# Altium PCB NB3000XN.PcbDoc (part 61 of 71)
Units mil, origin at the board's own origin, x right, y up, seen from the top; angles counter-clockwise.
Board outline 9527.56 x 6929.77 mil, 6 copper layers (Top Layer, GND+SHIELD, MidLayer1, MidLayer2, P2 - 3V3+5V0, Bottom Layer), stack 62.375 mil thick; 832 components, 1027 nets, 4655 pads, 4981 vias.
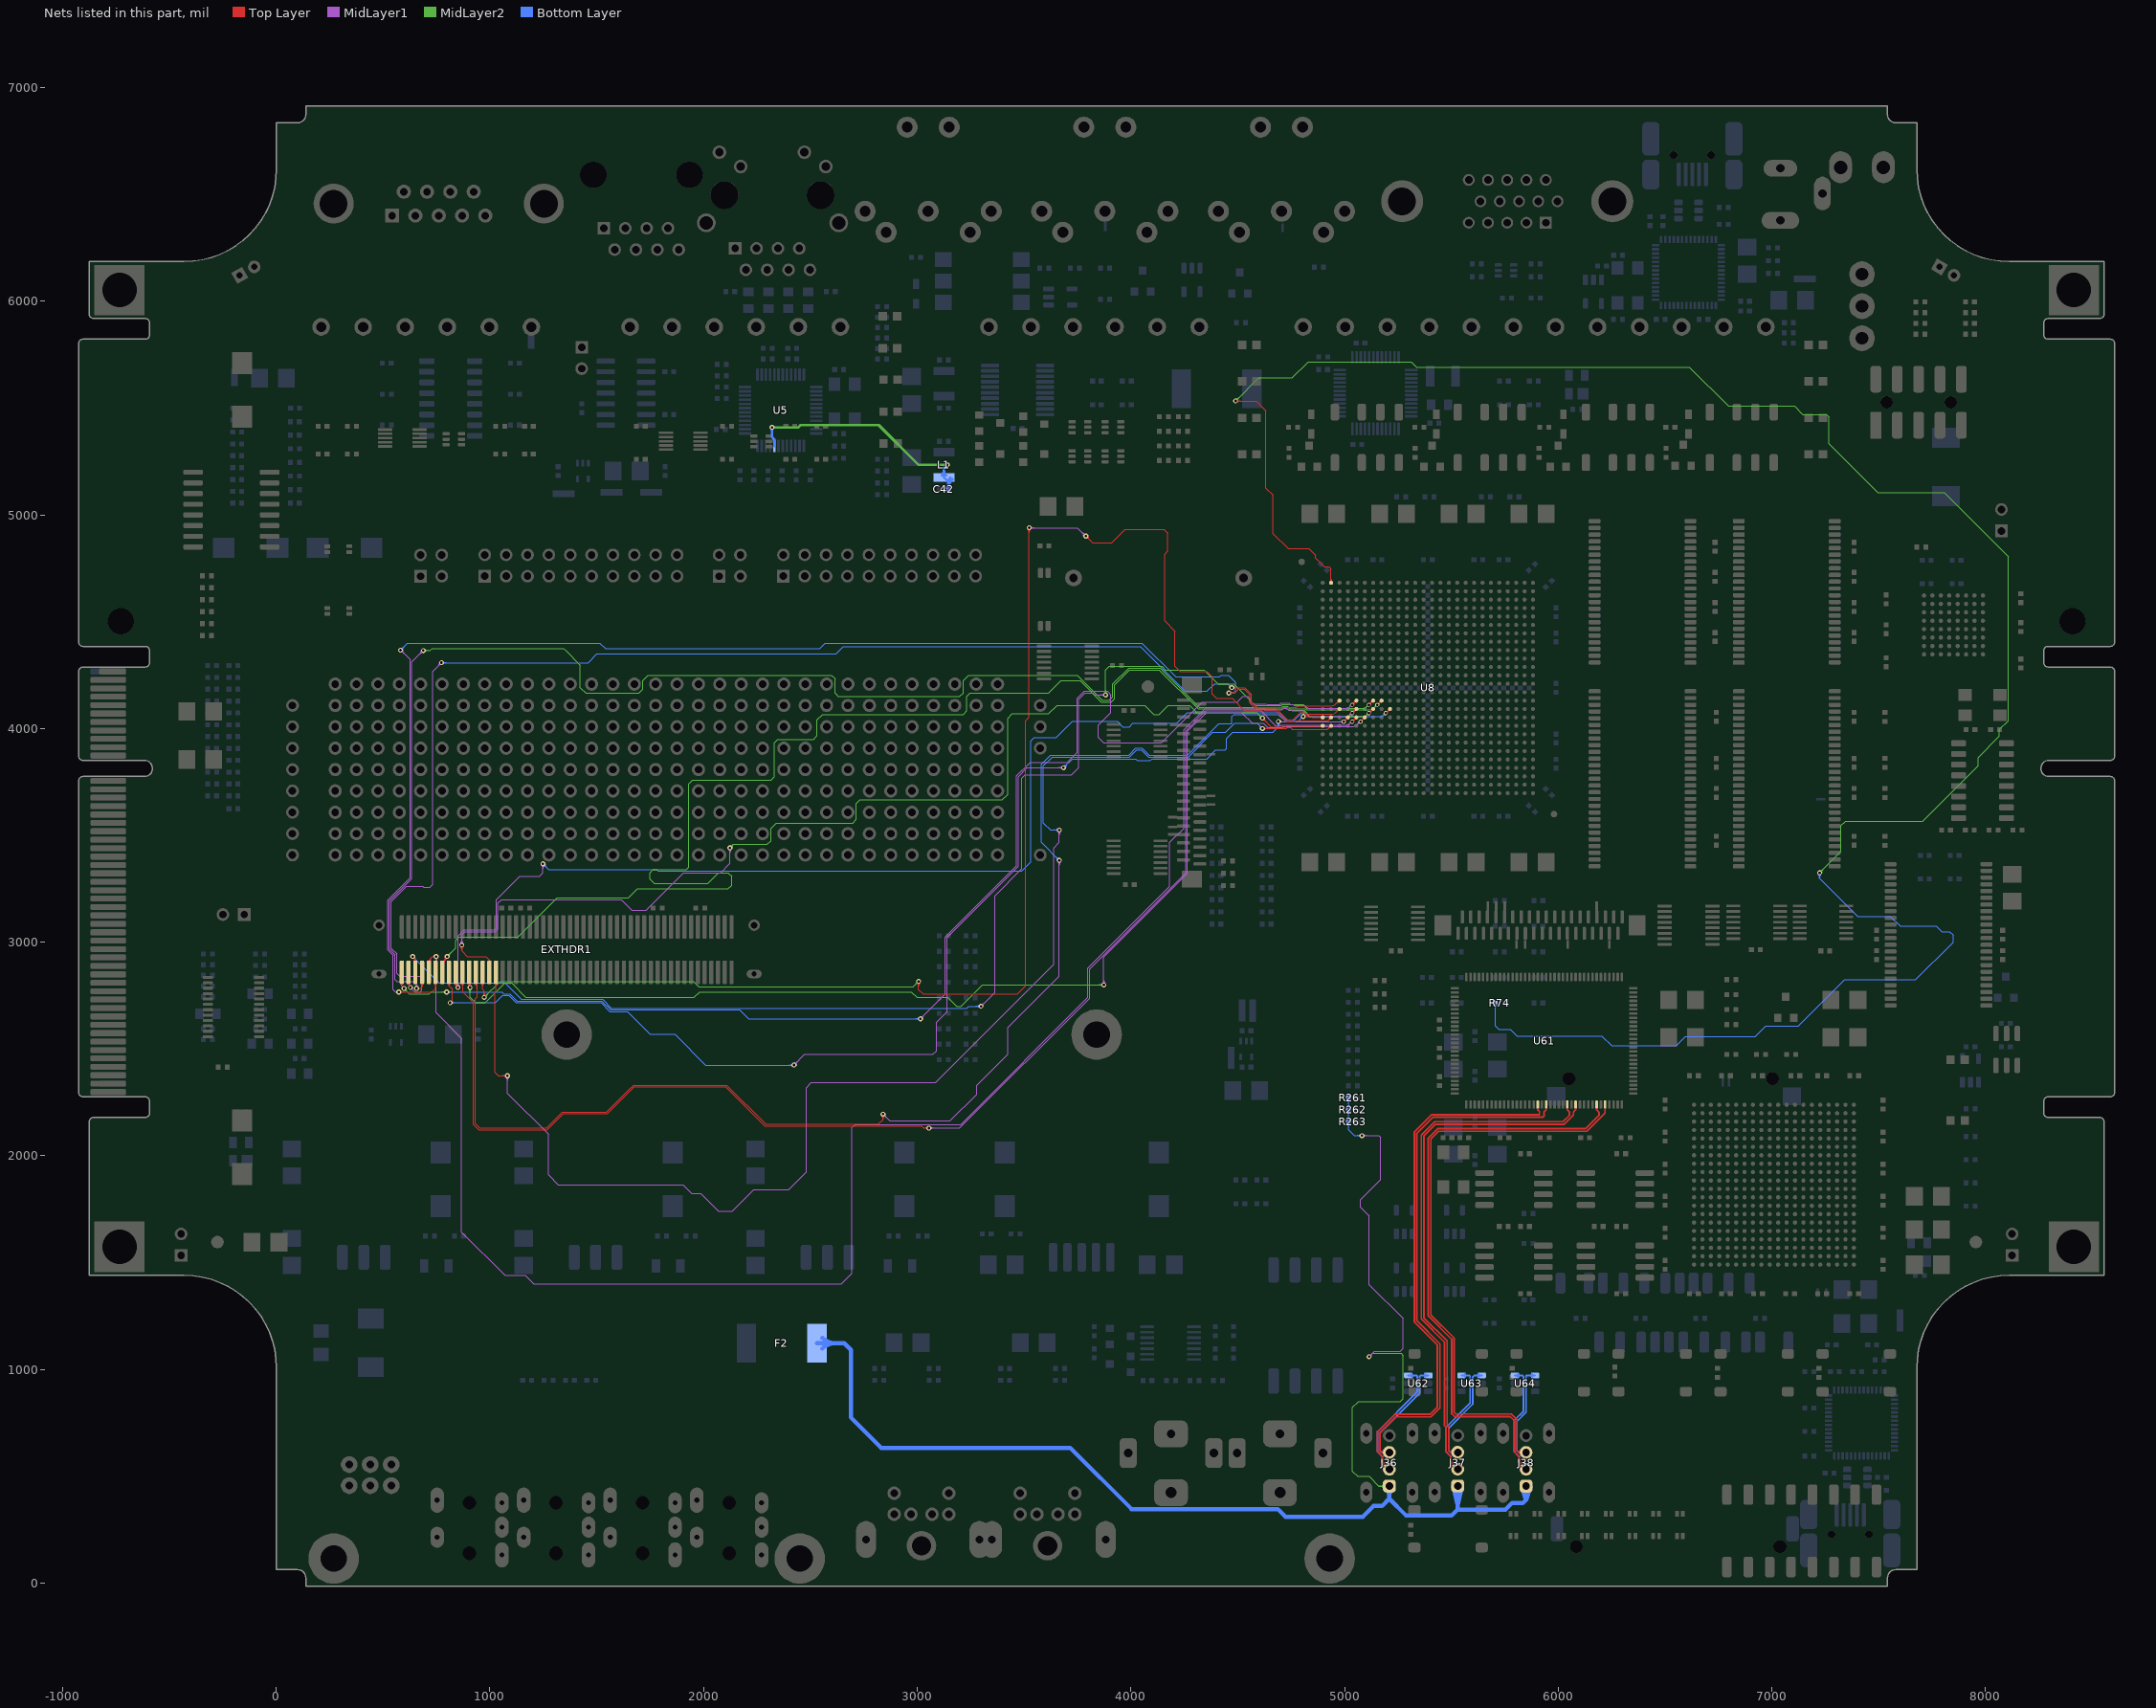
[diagram p65: the nets of this part, all layers, seen from the top]

## Via types
v1: diameter 23, hole 11.81, Top Layer to Bottom Layer, 3672 vias
v2: diameter 26, hole 11.81, Top Layer to Bottom Layer, 461 vias
v3: diameter 19, hole 11.81, Top Layer to Bottom Layer, tented both sides, 396 vias
v4: diameter 23.62, hole 11.81, Top Layer to Bottom Layer, 288 vias
v5: diameter 20, hole 11.81, Top Layer to Bottom Layer, 91 vias
v6: diameter 23, hole 11.81, Top Layer to Bottom Layer, tented both sides, 50 vias
v7: diameter 31, hole 11.81, Top Layer to Bottom Layer, 15 vias
v8: diameter 27.56, hole 11.81, Top Layer to Bottom Layer, tented both sides, 4 vias
v9: diameter 29, hole 11.81, Top Layer to Bottom Layer, 3 vias
v10: diameter 21, hole 11.81, Top Layer to Bottom Layer, 1 vias

## Nets (pads, with @x,y where several pads share a name; then routed paths per layer and width w, separated by ;. In a path a pad name is that pad's centre, name@x,y a point inside that pad or via, vN(x,y) a via of type N, cw(c..) or ccw(c..) an arc to the next point about the centre after c; other vN are vias at no path point) (continued)
PBIO.D35: EXTHDR1.72 U8.V2 | length 7156.9
  Top Layer w4: EXTHDR1.72@1023.3,2808.48 cw(c1009.65,2794.82) 1028.96,2794.82 cw(c1048.27,2794.82) EXTHDR1.72@1034.62,2808.48 ; EXTHDR1.72@1028.96,2814.13 EXTHDR1.72@1028.96,2859.25 1028.96,2770.43 1023.52,2765 1023.52,2391.71 1040.19,2375.04 v1(1081.86,2375.04) ; v1@1075.14,2368.32 ccw(c1058.92,2352.11) 1058.92,2375.04 ccw(c1058.92,2397.98) v1@1075.14,2381.76 ; v1@1077.97,2371.15 ccw(c1068.58,2361.76) 1068.58,2375.04 ccw(c1068.58,2388.32) v1@1077.97,2378.93 ; v1(4616.19,4000.04) 4727.77,4000.04 4732.94,4005.21 4747.44,4005.21 ; v1@4620.08,3996.15 cw(c4629.47,3986.76) 4629.47,4000.04 cw(c4629.47,4013.32) v1@4620.08,4003.93 ; v1@4622.91,3993.32 cw(c4639.13,3977.11) 4639.13,4000.04 cw(c4639.13,4022.98) v1@4622.91,4006.76 ; 4752.65,4000 4747.44,4005.21 ; U8.V2@4929.9,4012.83 cw(c4912.17,4012.83) 4924.71,4000.3 ; U8.V2@4937.24,4005.49 ccw(c4937.24,3987.77) 4924.71,4000.3 ; 4747.44,4005.21 4755.32,3997.33 4860,3997.33 4870,3997.33 4917.53,3997.33 ccw(c4917.53,4007.48) 4924.71,4000.3
  MidLayer1 w4: v1@1075.14,2368.32 cw(c1058.92,2352.11) 1081.86,2352.11 cw(c1104.79,2352.11) v1@1088.57,2368.32 ; v1@1077.97,2371.15 cw(c1068.58,2361.76) 1081.86,2361.76 cw(c1095.14,2361.76) v1@1085.75,2371.15 ; v1(1081.86,2375.04) 1081.86,2293.14 1273.86,2101.14 1273.86,1911.14 1320,1865 1905,1865 1945,1825 1986.71,1825 2070,1741.71 2135,1741.71 2235.29,1842 2398.82,1842 2481.86,1925.04 2481.86,2319.23 2505.13,2342.5 3085.63,2342.5 3108.73,2365.6 ; 3090.98,2347.85 3640,2896.87 3640,3441.52 3665.19,3466.71 v1(3665.19,3525.04) ; v1@3658.47,3518.32 cw(c3642.26,3502.11) 3665.19,3502.11 cw(c3688.13,3502.11) v1@3671.91,3518.32 ; v1@3661.3,3521.15 cw(c3651.91,3511.76) 3665.19,3511.76 cw(c3678.47,3511.76) v1@3669.08,3521.15
  Bottom Layer w4: v1@3658.47,3518.32 ccw(c3642.26,3502.11) 3642.26,3525.04 ccw(c3642.26,3547.98) v1@3658.47,3531.76 ; v1@3661.3,3521.15 ccw(c3651.91,3511.76) 3651.91,3525.04 ccw(c3651.91,3538.32) v1@3661.3,3528.93 ; v1(3665.19,3525.04) 3623.52,3525.04 3590.19,3558.37 3590.19,3825.04 3631.86,3866.71 3993.17,3866.71 4026.5,3900.04 4049.52,3900.04 4082.86,3866.71 4268.17,3866.71 4383.84,3982.37 4410,3982.37 4443.19,3982.37 4485.86,4025.04 4591.19,4025.04 v1(4616.19,4000.04) ; v1@4606.69,4000.04 ccw(c4583.76,4000.04) 4599.97,4016.26 ccw(c4616.19,4032.48) v1@4616.19,4009.54 ; v1@4610.69,4000.04 ccw(c4597.41,4000.04) 4606.8,4009.43 ccw(c4616.19,4018.82) v1@4616.19,4005.54
PBIO.D36: EXTHDR1.74 U8.V1 | length 5688.9
  Top Layer w4: v1@861.81,2979.99 cw(c845.59,2963.77) 868.52,2963.77 cw(c891.46,2963.77) v1@875.24,2979.99 ; v1@864.64,2982.82 cw(c855.25,2973.43) 868.52,2973.43 cw(c881.8,2973.43) v1@872.41,2982.82 ; v1(868.52,2986.71) 868.52,2958.37 893.52,2933.37 981.86,2933.37 997.46,2917.77 ; EXTHDR1.74@993.67,2911.41 ccw(c990.24,2917.77) 997.46,2917.77 ; EXTHDR1.74@997.46,2859.25 997.46,2917.77 ; EXTHDR1.74@1001.26,2911.41 cw(c1004.69,2917.77) 997.46,2917.77 ; v1@4616.19,4039.54 cw(c4616.19,4016.61) 4632.41,4032.82 cw(c4648.63,4049.04) v1@4625.69,4049.04 ; v1@4616.19,4043.54 cw(c4616.19,4030.26) 4625.58,4039.65 cw(c4634.97,4049.04) v1@4621.69,4049.04 ; v1(4616.19,4049.04) 4656.86,4008.37 4724.79,4008.37 4729.63,4013.21 4750.75,4013.21 4751.13,4012.83 4860,4012.83 4870,4012.83 U8.V1@4897.87,4012.83 ; U8.V1@4892.57,4007.53 ccw(c4879.77,3994.73) 4879.77,4012.83 ccw(c4879.77,4030.94) U8.V1@4892.57,4018.14 ; U8.V1@4892.68,4007.64 ccw(c4880.15,3995.11) 4880.15,4012.83 ccw(c4880.15,4030.56) U8.V1@4892.68,4018.03
  MidLayer1 w4: v1@861.81,2993.43 ccw(c845.59,3009.64) 868.52,3009.64 ccw(c891.46,3009.64) v1@875.24,2993.43 ; v1@864.64,2990.6 ccw(c855.25,2999.99) 868.52,2999.99 ccw(c881.8,2999.99) v1@872.41,2990.6 ; v1(868.52,2986.71) 868.52,3035.9 882.34,3049.71 1024.71,3049.71 1038,3063 1038,3183 1055.04,3200.04 1615.19,3200.04 1665.19,3150.04 1731.86,3150.04 1906.82,3325 2080,3325 2123.52,3368.52 v1(2123.52,3441.71) ; v1@2116.81,3434.99 cw(c2100.59,3418.77) 2123.52,3418.77 cw(c2146.46,3418.77) v1@2130.24,3434.99 ; v1@2119.64,3437.82 cw(c2110.25,3428.43) 2123.52,3428.43 cw(c2136.8,3428.43) v1@2127.41,3437.82
  MidLayer2 w4: v1(2123.52,3441.71) 2140.19,3458.37 2298.52,3458.37 2315.19,3475.04 2315.19,3533.37 2340.19,3558.37 2698.52,3558.37 2715.19,3575.04 2715.19,3650.04 2731.86,3666.71 3398.52,3666.71 3423.52,3691.71 3423.52,4048.52 3445,4070 3615.48,4070 3654.19,4108.71 4064.86,4108.71 4106.86,4066.71 4131.86,4066.71 4173.86,4108.71 4275.56,4108.71 4308.9,4075.37 4589.86,4075.37 v1(4616.19,4049.04) ; v1@2123.52,3447.21 ccw(c2123.52,3460.49) 2132.91,3451.1 ccw(c2142.3,3441.71) v1@2129.02,3441.71 ; v1@2123.52,3451.21 ccw(c2123.52,3474.14) 2139.74,3457.93 ccw(c2155.96,3441.71) v1@2133.02,3441.71 ; v1@4606.69,4049.04 ccw(c4583.76,4049.04) 4599.97,4065.26 ccw(c4616.19,4081.48) v1@4616.19,4058.54 ; v1@4610.69,4049.04 ccw(c4597.41,4049.04) 4606.8,4058.43 ccw(c4616.19,4067.82) v1@4616.19,4054.54
PBIO.D37: EXTHDR1.76 U8.U2 | length 7725.5
  Top Layer w4: EXTHDR1.76@960.31,2808.48 cw(c948.53,2796.69) 965.19,2796.69 ; 965.19,2792.94 cw(c987.16,2792.94) EXTHDR1.76@971.62,2808.48 ; 965.19,2802.6 cw(c977.5,2802.6) EXTHDR1.76@968.8,2811.3 ; EXTHDR1.76@965.19,2857.71 965.19,2780 973.52,2771.67 v1(973.52,2741.71) ; v1@966.81,2748.43 ccw(c950.59,2764.64) 973.52,2764.64 ccw(c996.46,2764.64) v1@980.24,2748.43 ; v1@969.64,2745.6 ccw(c960.25,2754.99) 973.52,2754.99 ccw(c986.8,2754.99) v1@977.41,2745.6 ; v1@3000.14,2809.99 cw(c2983.92,2793.77) 3006.86,2793.77 cw(c3029.79,2793.77) v1@3013.57,2809.99 ; v1@3002.97,2812.82 cw(c2993.58,2803.43) 3006.86,2803.43 cw(c3020.14,2803.43) v1@3010.75,2812.82 ; v1(3006.86,2816.71) 3006.86,2778.14 3027.46,2757.54 3469.4,2757.54 3506.86,2795 3506.86,4036.36 3523.86,4053.36 3523.86,4939.86 v4(3524,4940) ; v4@3517.06,4933.06 cw(c3500.66,4916.66) 3523.86,4916.66 ; v4@3519.89,4935.89 cw(c3510.32,4926.32) 3523.86,4926.32 ; 3523.86,4915.97 cw(c3548.03,4915.97) v4@3530.94,4933.06 ; 3523.86,4925.63 cw(c3538.37,4925.63) v4@3528.11,4935.89 ; v4@3789,4891.19 cw(c3789,4867.5) 3805.75,4884.25 cw(c3822.5,4901) v4@3798.81,4901 ; v4@3789,4895.19 cw(c3789,4881.16) 3798.92,4891.08 cw(c3808.84,4901) v4@3794.81,4901 ; v4(3789,4901) 3820,4870 3910.15,4870 3973.52,4933.37 4155,4933.37 4155,4933.04 4173.52,4914.52 4173.52,4832.02 4158,4816.5 4158,4503.86 4206.86,4455 4206.86,4291.71 4231.86,4266.71 4356.86,4266.71 4381.86,4241.71 4381.86,4161.36 4401.84,4141.37 4473.86,4141.37 4531.86,4083.37 4677.94,4083.37 4728.11,4033.21 4769.92,4033.21 4773.41,4036.7 4856.86,4036.7 ; 4855.26,4036.7 4860,4036.7 4870,4036.7 4917.53,4036.7 ; 4917.53,4036.7 ccw(c4917.53,4046.85) 4924.71,4039.67 ; 4917.53,4036.7 ccw(c4917.53,4046.85) 4924.71,4039.67 ; 4924.71,4039.67 ccw(c4912.17,4052.2) 4929.9,4052.2 cw(c4912.17,4052.2) 4924.71,4039.67 ; 4924.71,4039.67 cw(c4937.24,4027.14) 4937.24,4044.86 ccw(c4937.24,4027.14) 4924.71,4039.67
  MidLayer1 w4: v4(3524,4940) 3750,4940 v4(3789,4901) ; v4@3528.11,4935.89 cw(c3538.03,4925.97) 3538.03,4940 cw(c3538.03,4954.03) v4@3528.11,4944.11 ; v4@3530.94,4933.06 cw(c3547.69,4916.31) 3547.69,4940 cw(c3547.69,4963.69) v4@3530.94,4946.94 ; v4@3779.19,4901 ccw(c3755.5,4901) 3772.25,4917.75 ccw(c3789,4934.5) v4@3789,4910.81 ; v4@3783.19,4901 ccw(c3769.16,4901) 3779.08,4910.92 ccw(c3789,4920.84) v4@3789,4906.81
  MidLayer2 w4: v1(973.52,2741.71) 1048.52,2816.71 1920,2816.71 1952.98,2816.71 1977.98,2791.71 2131.86,2791.71 2140,2791.71 2981.86,2791.71 v1(3006.86,2816.71) ; v1@973.52,2747.21 ccw(c973.52,2760.49) 982.91,2751.1 ccw(c992.3,2741.71) v1@979.02,2741.71 ; v1@973.52,2751.21 ccw(c973.52,2774.14) 989.74,2757.93 ccw(c1005.96,2741.71) v1@983.02,2741.71 ; v1@2997.36,2816.71 cw(c2974.42,2816.71) 2990.64,2800.49 cw(c3006.86,2784.27) v1@3006.86,2807.21 ; v1@3001.36,2816.71 cw(c2988.08,2816.71) 2997.47,2807.32 cw(c3006.86,2797.93) v1@3006.86,2811.21
PBIO.D38: EXTHDR1.78 U8.U1 | length 6989.1
  Top Layer w4: EXTHDR1.78@928.81,2808.48 cw(c901.35,2781.01) 940.19,2781.01 ; EXTHDR1.78@931.64,2811.3 cw(c911.01,2790.67) 940.19,2790.67 ; EXTHDR1.78@934.47,2814.13 cw(c920.66,2800.32) 940.19,2800.32 ; EXTHDR1.78@940.19,2858.37 940.19,2745 931.52,2736.33 931.52,2150 951.52,2130 1265,2130 1340,2205 1546.31,2205 1651.23,2309.92 1672.31,2331 2107.69,2331 2290.69,2148 2818,2148 2840,2170 v1(2840,2195) ; v1@2833.28,2188.28 cw(c2817.06,2172.06) 2840,2172.06 cw(c2862.93,2172.06) v1@2846.72,2188.28 ; v1@2836.11,2191.11 cw(c2826.72,2181.72) 2840,2181.72 cw(c2853.28,2181.72) v1@2843.89,2191.11 ; v1(4806.86,4056.71) 4844.19,4056.71 4848.52,4052.37 4848.52,4052.2 4851.26,4052.2 4855.26,4052.2 4860,4052.2 4870,4052.2 U8.U1@4897.87,4052.2 ; U8.U1@4892.57,4046.9 ccw(c4879.77,4034.1) 4879.77,4052.2 ccw(c4879.77,4070.31) U8.U1@4892.57,4057.51 ; 4880.15,4052.2 cw(c4880.15,4034.48) 4892.68,4047.01 ccw(c4880.15,4034.48) 4880.15,4052.2 ; 4880.15,4052.2 ccw(c4880.15,4069.93) 4892.68,4057.4 cw(c4880.15,4069.93) 4880.15,4052.2
  MidLayer1 w4: v1@2840,2185.5 cw(c2840,2162.56) 2856.22,2178.78 cw(c2872.43,2195) v1@2849.5,2195 ; v1@2840,2189.5 cw(c2840,2176.22) 2849.39,2185.61 cw(c2858.78,2195) v1@2845.5,2195 ; v1(2840,2195) v1@2841.74,2193.26 ; v1@2840.19,2191.71 v1@2841.74,2193.26 ; v1@3658.47,3376.66 cw(c3642.26,3360.44) 3665.19,3360.44 cw(c3688.13,3360.44) v1@3671.91,3376.66 ; v1@3661.3,3379.49 cw(c3651.91,3370.1) 3665.19,3370.1 cw(c3678.47,3370.1) v1@3669.08,3379.49 ; v1(3665.19,3383.37) 3665.19,2841.71 3423.52,2600.04 3423.52,2475.04 3279.05,2330.57 3279.05,2288.22 3154.34,2163.5 2871.5,2163.5 v1@2841.74,2193.26
  Bottom Layer w4: v1@3655.69,3383.37 ccw(c3632.76,3383.37) 3648.97,3399.59 ccw(c3665.19,3415.81) v1@3665.19,3392.87 ; v1@3659.69,3383.37 ccw(c3646.41,3383.37) 3655.8,3392.76 ccw(c3665.19,3402.15) v1@3665.19,3388.87 ; v1(3665.19,3383.37) 3581.86,3466.71 3581.86,3833.37 3623.52,3875.04 3990.19,3875.04 4023.52,3908.37 4052.5,3908.37 4086.17,3874.71 4264.86,3874.71 4413.19,4023.04 4471.52,4023.04 4473.52,4025.04 4473.52,4056.37 4483.86,4066.71 4690.19,4066.71 4723.52,4033.37 4783.52,4033.37 v1(4806.86,4056.71) ; v1@4797.36,4056.71 cw(c4774.42,4056.71) 4790.64,4040.49 cw(c4806.86,4024.27) v1@4806.86,4047.21 ; v1@4801.36,4056.71 cw(c4788.08,4056.71) 4797.47,4047.32 cw(c4806.86,4037.93) v1@4806.86,4051.21
PBIO.D39: EXTHDR1.80 U8.U6 | length 5905.1
  Top Layer w4: EXTHDR1.80@897.32,2808.48 cw(c883.66,2794.82) 902.97,2794.82 cw(c922.29,2794.82) EXTHDR1.80@908.63,2808.48 ; v1@900.14,2795.09 ccw(c893.3,2801.94) 902.97,2801.94 ; v1@902.97,2792.26 EXTHDR1.80@902.97,2859.25 ; 902.97,2801.37 ccw(c919.85,2801.37) v1@907.92,2789.44 ; EXTHDR1.80@902.97,2811.03 ccw(c929.51,2811.03) v1@910.75,2792.26 ; EXTHDR1.80@902.97,2820.68 ccw(c939.17,2820.68) v1@913.57,2795.09 ; v3(5075.04,4032.52) U8.U6@5094.72,4052.2 ; U8.U6@5087.22,4052.2 cw(c5069.12,4052.2) 5081.92,4039.4 cw(c5094.72,4026.6) U8.U6@5094.72,4044.7 ; U8.U6@5087.38,4052.2 cw(c5069.66,4052.2) 5082.19,4039.67 cw(c5094.72,4027.14) U8.U6@5094.72,4044.86 ; 5087.84,4045.32 cw(c5075.04,4058.13) 5075.04,4040.02 ccw(c5075.04,4058.13) 5087.84,4045.32 ; 5087.84,4045.32 ccw(c5100.65,4032.52) 5082.54,4032.52 cw(c5100.65,4032.52) 5087.84,4045.32
  MidLayer1 w4: v1@3866.81,2806.76 ccw(c3850.59,2822.98) 3873.52,2822.98 ccw(c3896.46,2822.98) v1@3880.24,2806.76 ; v1@3869.64,2803.93 ccw(c3860.25,2813.32) 3873.52,2813.32 ccw(c3886.8,2813.32) v1@3877.41,2803.93 ; v1(3873.52,2800.04) 3873.52,2930.39 4264.52,3321.39 4264.52,3986.51 4353.05,4075.04 4518.19,4075.04 4568.19,4025.04 4620.52,4025.04 4640.19,4005.37 4710,4005.37 4713.28,4008.66 4860,4008.66 4870,4008.66 4918.62,4008.66 4938.04,4008.66 5012.16,4008.66 ; 4998.23,4008.66 5012.16,4008.66 ; v3@5067.57,4033.17 cw(c5049.53,4034.75) 5061.17,4020.88 ; v3@5074.39,4025.05 ccw(c5072.81,4007.01) 5061.17,4020.88 ; 5012.16,4008.66 5031.66,4008.66 ccw(c5031.66,4050.39) 5061.17,4020.88
  MidLayer2 w4: v1@900.14,2781.66 cw(c883.92,2765.44) 906.86,2765.44 cw(c929.79,2765.44) v1@913.57,2781.66 ; v1@902.97,2784.49 cw(c893.58,2775.1) 906.86,2775.1 cw(c920.14,2775.1) v1@910.75,2784.49 ; v1(906.86,2788.37) 906.86,2743.14 933.29,2716.71 979.52,2716.71 1071.19,2808.37 1101.5,2808.37 1168.17,2741.71 1956.33,2741.71 1982,2767.37 2973.02,2767.37 2998.35,2742.04 3142.96,2742.04 3184.96,2700.04 3205.86,2700.04 3305.86,2800.04 v1(3873.52,2800.04) ; v1@3866.81,2793.32 ccw(c3850.59,2777.11) 3850.59,2800.04 ccw(c3850.59,2822.98) v1@3866.81,2806.76 ; v1@3869.64,2796.15 ccw(c3860.25,2786.76) 3860.25,2800.04 ccw(c3860.25,2813.32) v1@3869.64,2803.93
PBIO.D40: EXTHDR1.82 U8.U5 | length 6640.7
  Top Layer w4: EXTHDR1.82@865.82,2808.48 cw(c847.23,2789.88) 873.52,2789.88 ; EXTHDR1.82@868.65,2811.3 cw(c856.88,2799.54) 873.52,2799.54 ; 873.52,2799.76 cw(c885.85,2799.76) EXTHDR1.82@877.14,2808.48 ; EXTHDR1.82@873.52,2859.25 873.52,2766.48 923.52,2716.48 923.52,2146.69 948.21,2122 1268.31,2122 1343.31,2197 1549.63,2197 1675.63,2323 2104.37,2323 2287.37,2140 3020,2140 3030,2130 v1(3055,2130) ; v1@3048.28,2123.28 ccw(c3032.06,2107.06) 3032.06,2130 ccw(c3032.06,2152.93) v1@3048.28,2136.72 ; v1@3051.11,2126.11 ccw(c3041.72,2116.72) 3041.72,2130 ccw(c3041.72,2143.28) v1@3051.11,2133.89 ; v3(5035.67,4032.52) U8.U5@5055.35,4052.2 ; U8.U5@5047.85,4052.2 cw(c5029.75,4052.2) 5042.55,4039.4 cw(c5055.35,4026.6) U8.U5@5055.35,4044.7 ; U8.U5@5048.01,4052.2 cw(c5030.29,4052.2) 5042.82,4039.67 cw(c5055.35,4027.14) U8.U5@5055.35,4044.86 ; 5048.47,4045.32 cw(c5035.67,4058.13) 5035.67,4040.02 ccw(c5035.67,4058.13) 5048.47,4045.32 ; 5048.47,4045.32 ccw(c5061.28,4032.52) 5043.17,4032.52 cw(c5061.28,4032.52) 5048.47,4045.32
  MidLayer1 w4: v1(3055,2130) 3198.13,2130 3806.86,2738.73 3806.86,2875.04 4234.16,3302.35 4256.52,3324.71 4256.52,3989.82 4350.07,4083.37 4608.52,4083.37 4676.86,4015.04 4700,4015.04 4701.97,4017.01 4860,4017.01 4870,4017.01 4918.62,4017.01 5012.16,4017.01 ccw(c5012.16,4031.06) 5022.09,4021.13 ; v1@3058.89,2126.11 cw(c3068.28,2116.72) 3068.28,2130 cw(c3068.28,2143.28) v1@3058.89,2133.89 ; v1@3061.72,2123.28 cw(c3077.93,2107.06) 3077.93,2130 cw(c3077.93,2152.93) v1@3061.72,2136.72 ; v3@5028.2,4033.17 cw(c5010.16,4034.75) 5021.8,4020.88 cw(c5033.44,4007.01) v3@5035.02,4025.05
PBIO.D41: EXTHDR1.84 U8.T9 | length 5958.9
  Top Layer w4: EXTHDR1.84@835.33,2807.62 cw(c828.87,2798.58) 839.98,2798.58 ; EXTHDR1.84@839.98,2859.25 839.98,2798.58 ; EXTHDR1.84@844.63,2807.62 ccw(c851.09,2798.58) 839.98,2798.58 ; v1(850.52,2788.04) 839.98,2798.58 ; v3(5193.15,4071.89) U8.T9@5212.83,4091.57 ; U8.T9@5205.33,4091.57 cw(c5187.23,4091.57) 5200.03,4078.77 cw(c5212.83,4065.97) U8.T9@5212.83,4084.07 ; U8.T9@5205.49,4091.57 cw(c5187.77,4091.57) 5200.3,4079.04 cw(c5212.83,4066.51) U8.T9@5212.83,4084.23 ; 5205.95,4084.69 cw(c5193.15,4097.5) 5193.15,4079.39 ccw(c5193.15,4097.5) 5205.95,4084.69 ; 5205.95,4084.69 ccw(c5218.76,4071.89) 5200.65,4071.89 cw(c5218.76,4071.89) 5205.95,4084.69
  MidLayer1 w4: v1@843.81,2794.76 ccw(c827.59,2810.98) 850.52,2810.98 ccw(c873.46,2810.98) v1@857.24,2794.76 ; v1@846.64,2791.93 ccw(c837.25,2801.32) 850.52,2801.32 ccw(c863.8,2801.32) v1@854.41,2791.93 ; v1(850.52,2788.04) 850.52,3029.21 879.02,3057.71 1021.39,3057.71 1030,3066.31 1030,3198.18 1088.77,3256.96 1140.19,3308.37 1231.86,3308.37 1248.52,3325.04 v1(1248.52,3366.71) ; v1@1241.81,3359.99 cw(c1225.59,3343.77) 1248.52,3343.77 cw(c1271.46,3343.77) v1@1255.24,3359.99 ; v1@1244.64,3362.82 cw(c1235.25,3353.43) 1248.52,3353.43 cw(c1261.8,3353.43) v1@1252.41,3362.82
  Bottom Layer w4: v1@1248.52,3357.21 cw(c1248.52,3334.27) 1264.74,3350.49 cw(c1280.96,3366.71) v1@1258.02,3366.71 ; v1@1248.52,3361.21 cw(c1248.52,3347.93) 1257.91,3357.32 cw(c1267.3,3366.71) v1@1254.02,3366.71 ; v1(1248.52,3366.71) 1274.19,3341.04 1780.15,3341.04 1787.82,3333.37 3490.19,3333.37 3531.86,3375.04 3531.86,3941.71 3548.52,3958.37 3651.51,3958.37 3726.84,4033.71 3936.88,4033.71 3962.21,4008.37 3993.17,4008.37 4009.84,4025.04 4215.19,4025.04 4265.19,4075.04 4693.17,4075.04 4726.5,4041.71 4765.19,4041.71 4798.52,4075.04 4815,4075.04 4833.66,4056.38 4860,4056.38 4870,4056.38 5076.1,4056.38 5169.64,4056.38 ccw(c5169.64,4070.43) 5179.57,4060.5 ; v3@5185.68,4072.54 cw(c5167.64,4074.12) 5179.28,4060.25 cw(c5190.92,4046.38) v3@5192.5,4064.42
PBIO.D42: EXTHDR1.86 U8.U4 | length 6374
  Top Layer w4: EXTHDR1.86@803.22,2808.11 cw(c793.09,2796.51) 808.49,2796.51 ; EXTHDR1.86@808.49,2859.25 808.49,2796.51 ; EXTHDR1.86@813.75,2808.11 ccw(c823.89,2796.51) 808.49,2796.51 ; v1(814.19,2716.71) 825,2727.52 825,2780 808.49,2796.51 ; v3(4996.3,4032.52) U8.U4@5015.98,4052.2 ; U8.U4@5008.48,4052.2 cw(c4990.38,4052.2) 5003.18,4039.4 cw(c5015.98,4026.6) U8.U4@5015.98,4044.7 ; U8.U4@5008.64,4052.2 cw(c4990.92,4052.2) 5003.45,4039.67 cw(c5015.98,4027.14) U8.U4@5015.98,4044.86 ; 5009.1,4045.32 cw(c4996.3,4058.13) 4996.3,4040.02 ccw(c4996.3,4058.13) 5009.1,4045.32 ; 5009.1,4045.32 ccw(c5021.91,4032.52) 5003.8,4032.52 cw(c5021.91,4032.52) 5009.1,4045.32
  MidLayer1 w4: v1(2423.52,2425.04) 2473.52,2475.04 3073.52,2475.04 3090.19,2491.71 3090.19,2625.04 3140.19,2675.04 3140.19,3022.06 3473.52,3355.39 3473.52,3775.04 3515.19,3816.71 v1(3684.86,3816.71) ; v1@2423.52,2430.54 ccw(c2423.52,2443.82) 2432.91,2434.43 ccw(c2442.3,2425.04) v1@2429.02,2425.04 ; v1@2423.52,2434.54 ccw(c2423.52,2457.48) 2439.74,2441.26 ccw(c2455.96,2425.04) v1@2433.02,2425.04 ; v1@3678.14,3809.99 ccw(c3661.92,3793.77) 3661.92,3816.71 ccw(c3661.92,3839.64) v1@3678.14,3823.43 ; v1@3680.97,3812.82 ccw(c3671.58,3803.43) 3671.58,3816.71 ccw(c3671.58,3829.99) v1@3680.97,3820.6 ; v1(4690.19,4033.37) 4692.36,4031.21 4820,4031.21 4821.31,4032.52 4860,4032.52 4870,4032.52 4918.62,4032.52 v3(4996.3,4032.52) ; v1@4694.08,4037.26 ccw(c4708.7,4051.88) 4708.7,4031.21 ; v1@4696.91,4026.66 cw(c4707.89,4015.67) 4707.89,4031.21 ; v1@4696.91,4040.09 ccw(c4718.36,4061.54) 4718.36,4031.21 ; v3@4991.11,4027.33 ccw(c4978.57,4014.79) 4978.57,4032.52 ccw(c4978.57,4050.25) v3@4991.11,4037.71 ; 4978.19,4032.52 ccw(c4978.19,4050.63) 4991,4037.82 cw(c4978.19,4050.63) 4978.19,4032.52 ; 4978.19,4032.52 cw(c4978.19,4014.41) 4991,4027.22 ccw(c4978.19,4014.41) 4978.19,4032.52
  Bottom Layer w4: v1(814.19,2716.71) 1025.96,2716.71 1059.63,2750.37 1089.6,2750.37 1103.68,2736.3 ; v1@818.08,2712.82 cw(c827.47,2703.43) 827.47,2716.71 cw(c827.47,2729.99) v1@818.08,2720.6 ; v1@820.91,2709.99 cw(c837.13,2693.77) 837.13,2716.71 cw(c837.13,2739.64) v1@820.91,2723.43 ; 1103.63,2736.25 1122.5,2717.37 1520.23,2717.37 1561.9,2675.71 1644.29,2675.71 1750,2570 1865,2570 2009.96,2425.04 v1(2423.52,2425.04) ; v1@2416.81,2418.32 ccw(c2400.59,2402.11) 2400.59,2425.04 ccw(c2400.59,2447.98) v1@2416.81,2431.76 ; v1@2419.64,2421.15 ccw(c2410.25,2411.76) 2410.25,2425.04 ccw(c2410.25,2438.32) v1@2419.64,2428.93 ; v1(3684.86,3816.71) 3726.52,3858.37 4023.52,3858.37 4031.86,3850.04 4090.19,3850.04 4098.52,3858.37 4356.86,3858.37 4397.52,3899.04 4440.19,3899.04 4448.52,3907.37 4448.52,3953.02 4477.88,3982.37 4665.19,3982.37 4690.19,4007.37 v1(4690.19,4033.37) ; v1@3684.86,3822.21 ccw(c3684.86,3835.49) 3694.25,3826.1 ccw(c3703.64,3816.71) v1@3690.36,3816.71 ; v1@3684.86,3826.21 ccw(c3684.86,3849.14) 3701.07,3832.93 ccw(c3717.29,3816.71) v1@3694.36,3816.71 ; v1@4683.47,4026.66 cw(c4667.26,4010.44) 4690.19,4010.44 cw(c4713.13,4010.44) v1@4696.91,4026.66 ; v1@4686.3,4029.49 cw(c4676.91,4020.1) 4690.19,4020.1 cw(c4703.47,4020.1) v1@4694.08,4029.49
PBIO.D43: EXTHDR1.88 U8.T7 | length 6778.2
  Top Layer w4: EXTHDR1.88@776.99,2859.25 776.99,2902.17 804.02,2929.21 808.19,2933.37 v1(799.86,2933.37) ; EXTHDR1.88@776.99,2908.37 ccw(c776.99,2923.32) 787.56,2912.75 ; EXTHDR1.88@776.99,2912.37 ccw(c776.99,2936.98) 794.39,2919.58 ; EXTHDR1.88@781.16,2906.34 ccw(c758.41,2929.09) v1@790.41,2932.4 ; EXTHDR1.88@784.99,2904.37 cw(c799.01,2904.37) 789.1,2914.28 ; 787.1,2912.28 ccw(c769.18,2930.2) v1@794.39,2932.81 ; 793.04,2918.23 ccw(c779.95,2931.31) v1@798.37,2933.22 ; v3(5114.41,4071.89) U8.T7@5134.09,4091.57 ; U8.T7@5126.59,4091.57 cw(c5108.49,4091.57) 5121.29,4078.77 cw(c5134.09,4065.97) U8.T7@5134.09,4084.07 ; U8.T7@5126.75,4091.57 cw(c5109.03,4091.57) 5121.56,4079.04 cw(c5134.09,4066.51) U8.T7@5134.09,4084.23 ; 5127.21,4084.69 cw(c5114.41,4097.5) 5114.41,4079.39 ccw(c5114.41,4097.5) 5127.21,4084.69 ; 5127.21,4084.69 ccw(c5140.02,4071.89) 5121.91,4071.89 cw(c5140.02,4071.89) 5127.21,4084.69
  MidLayer2 w4: v1(799.86,2933.37) 840.19,2973.71 840.19,3008.37 856.86,3025.04 1131.86,3025.04 1305.18,3198.37 1314.86,3208.04 1649.35,3208.04 1691.35,3250.04 2115.19,3250.04 2131.86,3266.71 2131.86,3308.37 2115.19,3325.04 2070,3325.04 2020,3275.04 1768.86,3275.04 1748.52,3295.37 1748.52,3325.04 1763.48,3340 1920,3340 1931.86,3351.86 1931.86,3741.71 1948.52,3758.37 2315.19,3758.37 2331.86,3775.04 2331.86,3933.37 2348.52,3950.04 2515.19,3950.04 2531.86,3966.71 2531.86,4041.71 2556.86,4066.71 3215.19,4066.71 3231.86,4083.37 3231.86,4150.04 3248.52,4166.71 3615.19,4166.71 3673.52,4225.04 3762.21,4225.04 3862.21,4125.04 3907.86,4125.04 3923.52,4140.71 3923.52,4205.39 3993.13,4275 4080,4275 4131.86,4275.04 4315.19,4091.71 4709.71,4091.71 4713.92,4095.92 4728.67,4095.92 4739.55,4085.04 4810,4085.04 4838.66,4056.38 4860,4056.38 4870,4056.38 4997.36,4056.38 5090.9,4056.38 ccw(c5090.9,4070.43) 5100.83,4060.5 ; v1@799.86,2938.87 ccw(c799.86,2952.15) 809.25,2942.76 ccw(c818.64,2933.37) v1@805.36,2933.37 ; v1@799.86,2942.87 ccw(c799.86,2965.81) 816.07,2949.59 ccw(c832.29,2933.37) v1@809.36,2933.37 ; v3@5106.94,4072.54 cw(c5088.9,4074.12) 5100.54,4060.25 cw(c5112.18,4046.38) v3@5113.76,4064.42
PBIO.D44: EXTHDR1.90 U8.T3 | length 7061.7
  Top Layer w4: v1@577.41,2770.6 ccw(c588.81,2782) 588.81,2765.87 ; v1@580.24,2759.99 cw(c594.45,2745.78) 594.45,2765.87 ; v1@580.24,2773.43 ccw(c598.47,2791.65) 598.47,2765.87 ; EXTHDR1.90@739.84,2808.48 cw(c726.18,2794.82) 745.49,2794.82 cw(c764.81,2794.82) EXTHDR1.90@751.15,2808.48 ; EXTHDR1.90@745.49,2859.25 745.49,2781.97 729.4,2765.87 v1@581.02,2765.87 ; v1(4458.52,4166.71) 4486.71,4166.71 4503.71,4183.71 4530.88,4183.71 4557.19,4157.39 4557.19,4120.04 4585.52,4091.71 4650,4091.71 ; v1@4462.41,4162.82 cw(c4471.8,4153.43) 4471.8,4166.71 cw(c4471.8,4179.99) v1@4462.41,4170.6 ; v1@4465.24,4159.99 cw(c4481.46,4143.77) 4481.46,4166.71 cw(c4481.46,4189.64) v1@4465.24,4173.43 ; 4676.54,4091.71 4650,4091.71 ; 4855.26,4067.71 4860,4067.71 ; U8.T3@4969.27,4091.57 cw(c4951.55,4091.57) 4964.08,4079.04 ; U8.T3@4976.61,4084.23 ccw(c4976.61,4066.51) 4964.08,4079.04 ; v1@581.02,2765.87 574.36,2765.87 v1(573.52,2766.71) 580.19,2766.71 v1@581.02,2765.87 ; 4650,4091.71 4680.92,4091.71 4731.42,4041.21 4759.09,4041.21 4792.09,4074.21 4814.11,4074.21 4820.46,4067.85 ; 4820.46,4067.85 4820.46,4067.71 4820.6,4067.71 ; 4820.46,4067.85 4820.6,4067.71 ; 4820.6,4067.71 4856.86,4067.71 4860,4067.71 ; 4860,4067.71 4870,4067.71 ; 4870,4067.71 4896.53,4067.71 ; 4870,4067.71 4896.53,4067.71 ; 4896.53,4067.71 4936.73,4067.71 ccw(c4936.73,4106.39) 4964.08,4079.04
  MidLayer1 w4: v1(573.52,2766.71) 558.29,2766.71 547.86,2777.14 547.86,2938.48 521.61,2964.73 521.61,3196.35 627,3301.75 627,4323 v1@580,4370 ; v1@581.86,4357.21 cw(c581.86,4330.81) 600.52,4349.48 ; v1@581.86,4361.21 cw(c581.86,4344.47) 593.7,4356.3 ; v1@591.36,4366.71 ccw(c610.83,4366.71) 597.06,4352.94
  Bottom Layer w4: v1(581.86,4366.71) 615.19,4400.04 1515,4400.04 1540.67,4374.37 2544.33,4374.37 2570,4400.04 4051.54,4400.04 4209.88,4241.71 4415.19,4241.71 4423.52,4250.04 4456.86,4250.04 4490.19,4216.71 4490.19,4175.04 4481.86,4166.71 v1(4458.52,4166.71) ; v1@581.86,4372.21 ccw(c581.86,4385.49) 591.25,4376.1 ccw(c600.64,4366.71) v1@587.36,4366.71 ; v1@581.86,4376.21 ccw(c581.86,4399.14) 598.07,4382.93 ccw(c614.29,4366.71) v1@591.36,4366.71 ; v1@4462.41,4162.82 cw(c4471.8,4153.43) 4471.8,4166.71 cw(c4471.8,4179.99) v1@4462.41,4170.6 ; v1@4465.24,4159.99 cw(c4481.46,4143.77) 4481.46,4166.71 cw(c4481.46,4189.64) v1@4465.24,4173.43
PBIO.D45: EXTHDR1.92 U8.T5 | length 8027
  Top Layer w4: EXTHDR1.92@710.18,2903.17 cw(c720.88,2906.54) 712.95,2914.47 ; EXTHDR1.92@711.44,2911.95 ccw(c710.23,2915.51) 714,2915.51 ; EXTHDR1.92@714,2859.25 714,2915.52 ; EXTHDR1.92@714,2904.37 cw(c727.97,2908.77) 717.61,2919.13 ; EXTHDR1.92@716.56,2911.95 cw(c717.76,2915.51) 714,2915.51 ; EXTHDR1.92@717.81,2905.57 cw(c735.06,2911) 722.28,2923.79 ; EXTHDR1.92@721.63,2906.77 cw(c742.16,2913.24) 726.94,2928.46 ; v1@740.35,2928.53 ccw(c731.86,2923.51) 731.86,2933.37 ; v1@740.35,2938.22 cw(c731.86,2943.24) 731.86,2933.37 ; v1(748.52,2933.37) 731.86,2933.37 ; v3(5035.67,4071.89) U8.T5@5055.35,4091.57 ; U8.T5@5047.85,4091.57 cw(c5029.75,4091.57) 5042.55,4078.77 cw(c5055.35,4065.97) U8.T5@5055.35,4084.07 ; U8.T5@5048.01,4091.57 cw(c5030.29,4091.57) 5042.82,4079.04 cw(c5055.35,4066.51) U8.T5@5055.35,4084.23 ; 714,2915.52 726.94,2928.46 ; 726.94,2928.46 731.86,2933.37 ; 5048.47,4084.69 cw(c5035.67,4097.5) 5035.67,4079.39 ccw(c5035.67,4097.5) 5048.47,4084.69 ; 5048.47,4084.69 ccw(c5061.28,4071.89) 5043.17,4071.89 cw(c5061.28,4071.89) 5048.47,4084.69
  MidLayer1 w4: v1@741.81,2926.66 cw(c725.59,2910.44) 748.52,2910.44 cw(c771.46,2910.44) v1@755.24,2926.66 ; v1@744.64,2929.49 cw(c735.25,2920.1) 748.52,2920.1 cw(c761.8,2920.1) v1@752.41,2929.49 ; v1(748.52,2933.37) 748.52,2669.64 868,2550.16 868,1643.06 1070.56,1440.5 1165.56,1440.5 1206.02,1400.04 2645,1400.04 2695,1450.04 2695,2132.5 2710,2147.5 3204.32,2147.5 3798.86,2742.04 3798.86,2878.36 3850.43,2929.93 4181.86,3261.36 4181.86,3466.71 4248.52,3533.37 4248.52,3993.14 4347.09,4091.71 4623.52,4091.71 4627.52,4087.71 4705.71,4087.71 4713.92,4095.92 4728.67,4095.92 4736.88,4087.71 4749.53,4087.71 4753.86,4083.37 4806.86,4083.37 4833.85,4056.38 4860,4056.38 4870,4056.38 4918.62,4056.38 5012.16,4056.38 ccw(c5012.16,4070.43) 5022.09,4060.5 ; v3@5028.2,4072.54 cw(c5010.16,4074.12) 5021.8,4060.25 cw(c5033.44,4046.38) v3@5035.02,4064.42
PBIO.D46: EXTHDR1.94 U8.R8 | length 7292.9
  Top Layer w4: v1(656.86,2783.37) 674.5,2783.37 ; v1@664.79,2778.14 cw(c674.5,2771.74) 674.5,2783.37 ; v1@664.79,2788.6 ccw(c674.5,2795.01) 674.5,2783.37 ; EXTHDR1.94@676.85,2808.48 cw(c663.19,2794.82) 682.5,2794.82 cw(c701.82,2794.82) EXTHDR1.94@688.16,2808.48 ; EXTHDR1.94@682.5,2859.25 682.5,2791.37 674.5,2783.37 ; v3(5153.78,4111.26) U8.R8@5173.46,4130.94 ; U8.R8@5165.96,4130.94 cw(c5147.86,4130.94) 5160.66,4118.14 cw(c5173.46,4105.34) U8.R8@5173.46,4123.44 ; U8.R8@5166.12,4130.94 cw(c5148.4,4130.94) 5160.93,4118.41 cw(c5173.46,4105.88) U8.R8@5173.46,4123.6 ; 5166.58,4124.06 cw(c5153.78,4136.87) 5153.78,4118.76 ccw(c5153.78,4136.87) 5166.58,4124.06 ; 5166.58,4124.06 ccw(c5179.39,4111.26) 5161.28,4111.26 cw(c5179.39,4111.26) 5166.58,4124.06
  MidLayer1 w4: v1@650.14,2790.09 ccw(c633.92,2806.31) 656.86,2806.31 ccw(c679.79,2806.31) v1@663.57,2790.09 ; v1@652.97,2787.26 ccw(c643.58,2796.65) 656.86,2796.65 ccw(c670.14,2796.65) v1@660.75,2787.26 ; v1(656.86,2783.37) 656.86,2808.14 650,2815 565,2815 555.86,2824.14 555.86,2941.8 529.61,2968.04 529.61,3193.04 635,3298.43 635,4311.52 v1(688.52,4365.04) ; v1@679.02,4365.04 cw(c656.09,4365.04) 672.31,4348.82 cw(c688.52,4332.61) v1@688.52,4355.54 ; v1@683.02,4365.04 cw(c669.75,4365.04) 679.14,4355.65 cw(c688.52,4346.26) v1@688.52,4359.54
  MidLayer2 w4: v1(688.52,4365.04) 720,4365.04 730.33,4375.37 1344.67,4375.37 1355,4365.04 1355.54,4365.04 1423.52,4297.06 1423.52,4191.71 1448.52,4166.71 1698.52,4166.71 1715.19,4183.37 1715.19,4225.04 1740.19,4250.04 2598.52,4250.04 2615.19,4233.37 2615.19,4165.71 2630.52,4150.37 2630.52,4150 2655,4150 3198.52,4150.04 3215.19,4166.71 3215.19,4225.04 3240.19,4250.04 3748.52,4250.04 3865.19,4133.37 3899.86,4133.37 3915.19,4148.71 3915.19,4208.37 3990.19,4283.37 4137.52,4283.37 4320.86,4100.04 4706.73,4100.04 4710.61,4103.92 4731.99,4103.92 4742.86,4093.04 4813.31,4093.04 4818.96,4087.4 4860,4087.4 4870,4087.4 4997.36,4087.4 5016.78,4087.4 5090.9,4087.4 5110.4,4087.4 ccw(c5110.4,4129.13) 5139.91,4099.62 ; v1@692.41,4361.15 cw(c701.8,4351.76) 701.8,4365.04 cw(c701.8,4378.32) v1@692.41,4368.93 ; v1@695.24,4358.32 cw(c711.46,4342.11) 711.46,4365.04 cw(c711.46,4387.98) v1@695.24,4371.76 ; v3@5146.31,4111.91 cw(c5128.27,4113.49) 5139.91,4099.62 ; v3@5153.13,4103.79 ccw(c5151.55,4085.75) 5139.91,4099.62
PBIO.D47: EXTHDR1.96 U8.R7 | length 6631.3
  Top Layer w4: v1(638.52,2933.37) 648.52,2923.37 ; EXTHDR1.96@645.35,2910.03 ccw(c637.68,2917.69) 648.52,2917.69 ; EXTHDR1.96@648.52,2883.37 648.52,2923.37 ; 648.52,2916.12 ccw(c658.42,2916.12) EXTHDR1.96@653.14,2907.75 ; EXTHDR1.96@655.27,2911.13 cw(c663,2923.37) 648.52,2923.37 ; v3(5114.41,4111.26) U8.R7@5134.09,4130.94 ; U8.R7@5126.59,4130.94 cw(c5108.49,4130.94) 5121.29,4118.14 cw(c5134.09,4105.34) U8.R7@5134.09,4123.44 ; U8.R7@5126.75,4130.94 cw(c5109.03,4130.94) 5121.56,4118.41 cw(c5134.09,4105.88) U8.R7@5134.09,4123.6 ; 5127.21,4124.06 cw(c5114.41,4136.87) 5114.41,4118.76 ccw(c5114.41,4136.87) 5127.21,4124.06 ; 5127.21,4124.06 ccw(c5140.02,4111.26) 5121.91,4111.26 cw(c5140.02,4111.26) 5127.21,4124.06
  MidLayer1 w4: v1(3298.52,2700.04) 3363,2764.52 3363,3218 3489.52,3344.52 3489.52,3768.41 3504.49,3783.37 3723.37,3783.37 3756.19,3816.19 3756.19,4138.06 3785.17,4167.04 3822.96,4167.04 3832.96,4157.04 v1(3881.86,4157.04) ; v1@3298.52,2705.54 ccw(c3298.52,2718.82) 3307.91,2709.43 ccw(c3317.3,2700.04) v1@3304.02,2700.04 ; v1@3298.52,2709.54 ccw(c3298.52,2732.48) 3314.74,2716.26 ccw(c3330.96,2700.04) v1@3308.02,2700.04 ; v1@3875.14,4150.32 ccw(c3858.92,4134.11) 3858.92,4157.04 ccw(c3858.92,4179.98) v1@3875.14,4163.76 ; v1@3877.97,4153.15 ccw(c3868.58,4143.76) 3868.58,4157.04 ccw(c3868.58,4170.32) v1@3877.97,4160.93
  MidLayer2 w4: v1@3875.14,4163.76 ccw(c3858.92,4179.98) 3881.86,4179.98 ccw(c3904.79,4179.98) v1@3888.57,4163.76 ; v1@3877.97,4160.93 ccw(c3868.58,4170.32) 3881.86,4170.32 ccw(c3895.14,4170.32) v1@3885.75,4160.93 ; v1(3881.86,4157.04) 3881.86,4275.04 3898.52,4291.71 4144.86,4291.71 4161.52,4275.04 4342.19,4275.04 4407.86,4209.37 4481.86,4209.37 4582.86,4108.37 4703.75,4108.37 4707.29,4111.92 4805.75,4111.92 4821.92,4095.75 4860,4095.75 4870,4095.75 4997.36,4095.75 5090.9,4095.75 ccw(c5090.9,4109.8) 5100.83,4099.87 ; v3@5106.94,4111.91 cw(c5088.9,4113.49) 5100.54,4099.62 cw(c5112.18,4085.75) v3@5113.76,4103.79
  Bottom Layer w4: v1@638.52,2923.87 cw(c638.52,2900.94) 654.74,2917.16 cw(c670.96,2933.37) v1@648.02,2933.37 ; v1@638.52,2927.87 cw(c638.52,2914.6) 647.91,2923.99 cw(c657.3,2933.37) v1@644.02,2933.37 ; v1(638.52,2933.37) 761.9,2810 1070,2810 1146.63,2733.37 1526.86,2733.37 1568.52,2691.71 3231.86,2691.71 3240.19,2700.04 v1(3298.52,2700.04) ; v1@3291.81,2693.32 ccw(c3275.59,2677.11) 3275.59,2700.04 ccw(c3275.59,2722.98) v1@3291.81,2706.76 ; v1@3294.64,2696.15 ccw(c3285.25,2686.76) 3285.25,2700.04 ccw(c3285.25,2713.32) v1@3294.64,2703.93
PBIO.D48: EXTHDR1.98 U8.R3 | length 6674.9
  Top Layer w4: EXTHDR1.98@616.39,2806.77 cw(c614.39,2802.06) 619.51,2802.06 ; EXTHDR1.98@619.51,2859.25 619.51,2802.05 ; EXTHDR1.98@622.63,2806.77 ccw(c624.63,2802.06) 619.51,2802.06 ; v1(627.86,2788.37) 627.86,2793.71 619.51,2802.05 ; v1(4472.52,4191.71) 4534.19,4191.71 4565.19,4160.71 4565.19,4123.37 4588.86,4099.71 4775.62,4099.71 4783,4107.08 4855.26,4107.08 4860,4107.08 4870,4107.08 4936.73,4107.08 ccw(c4936.73,4145.76) 4964.08,4118.41 ; v1@4476.41,4187.82 cw(c4485.8,4178.43) 4485.8,4191.71 cw(c4485.8,4204.99) v1@4476.41,4195.6 ; v1@4479.24,4184.99 cw(c4495.46,4168.77) 4495.46,4191.71 cw(c4495.46,4214.64) v1@4479.24,4198.43 ; U8.R3@4969.27,4130.94 cw(c4951.55,4130.94) 4964.08,4118.41 ; U8.R3@4976.61,4123.6 ccw(c4976.61,4105.88) 4964.08,4118.41
  MidLayer1 w4: 549.88,3202 578,3230.12 ; v1(627.86,2788.37) 627.86,2787.63 649.61,2765.87 672.69,2765.87 673.52,2766.71 ; v1@764.02,4308.37 cw(c741.09,4308.37) 757.31,4292.16 cw(c773.52,4275.94) v1@773.52,4298.87 ; v1@768.02,4308.37 cw(c754.75,4308.37) 764.14,4298.99 cw(c773.52,4289.6) v1@773.52,4302.87 ; v1(773.52,4308.37) 731.86,4266.71 731.86,3270 719.4,3257.54 691.28,3257.54 686.32,3262.5 610.38,3262.5 578,3230.12 ; 578,3230.12 537.61,3189.73 537.61,2971.36 563.86,2945.11 563.86,2855 577.4,2841.46 673.54,2841.46 681.86,2833.14 681.86,2775.04 ; 673.52,2766.71 681.86,2775.04 ; 673.52,2766.71 681.86,2775.04
  Bottom Layer w4: v1(773.52,4308.37) 1460,4308.37 1502,4350.37 1632.19,4350.37 1685,4350.37 2620.37,4350.37 2654.04,4384.04 4044.92,4384.04 4253.92,4175.04 4356.86,4175.04 4391.19,4209.37 4454.86,4209.37 v1(4472.52,4191.71) ; v1@777.41,4304.49 cw(c786.8,4295.1) 786.8,4308.37 cw(c786.8,4321.65) v1@777.41,4312.26 ; v1@780.24,4301.66 cw(c796.46,4285.44) 796.46,4308.37 cw(c796.46,4331.31) v1@780.24,4315.09 ; v1@4463.02,4191.71 ccw(c4440.09,4191.71) 4456.31,4207.93 ccw(c4472.52,4224.14) v1@4472.52,4201.21 ; v1@4467.02,4191.71 ccw(c4453.75,4191.71) 4463.14,4201.1 ccw(c4472.52,4210.49) v1@4472.52,4197.21
PBIO.D49: EXTHDR1.100 U8.R5 | length 6670
  Top Layer w4: EXTHDR1.100@582.36,2808.48 cw(c568.7,2794.82) 588.01,2794.82 cw(c607.33,2794.82) EXTHDR1.100@593.67,2808.48 ; EXTHDR1.100@588.01,2859.25 588.01,2793.88 v1(598.52,2783.37) ; v3(5035.67,4111.26) U8.R5@5055.35,4130.94 ; U8.R5@5047.85,4130.94 cw(c5029.75,4130.94) 5042.55,4118.14 cw(c5055.35,4105.34) U8.R5@5055.35,4123.44 ; U8.R5@5048.01,4130.94 cw(c5030.29,4130.94) 5042.82,4118.41 cw(c5055.35,4105.88) U8.R5@5055.35,4123.6 ; 5048.47,4124.06 cw(c5035.67,4136.87) 5035.67,4118.76 ccw(c5035.67,4136.87) 5048.47,4124.06 ; 5048.47,4124.06 ccw(c5061.28,4111.26) 5043.17,4111.26 cw(c5061.28,4111.26) 5048.47,4124.06
  MidLayer1 w4: v1(3015.19,2641.71) 3131.86,2758.37 3131.86,3025.04 3465.19,3358.37 3465.19,3778.02 3528.88,3841.71 3701.5,3841.71 3748.19,3888.39 3748.19,4141.37 3765.19,4158.37 3781.86,4175.04 3890.19,4175.04 3906.86,4158.37 3906.86,4075.04 3848.52,4016.71 3848.52,3958.37 3873.52,3933.37 4143.51,3933.37 4333.84,4123.71 4498.52,4123.71 4506.86,4132.04 4506.86,4133.37 4523.52,4150.04 4548.52,4150.04 4556.86,4141.71 4556.86,4124.04 4565.19,4115.71 4633.47,4115.71 4637.47,4111.71 4695.77,4111.71 4703.98,4119.92 4738.62,4119.92 4745.99,4112.54 4758.64,4112.54 4762.8,4108.37 4815.8,4108.37 4828.42,4095.75 4860,4095.75 4870,4095.75 4918.62,4095.75 5012.16,4095.75 ccw(c5012.16,4109.8) 5022.09,4099.87 ; v1@3015.19,2647.21 ccw(c3015.19,2660.49) 3024.58,2651.1 ccw(c3033.97,2641.71) v1@3020.69,2641.71 ; v1@3015.19,2651.21 ccw(c3015.19,2674.14) 3031.41,2657.93 ccw(c3047.63,2641.71) v1@3024.69,2641.71 ; v3@5028.2,4111.91 cw(c5010.16,4113.49) 5021.8,4099.62 cw(c5033.44,4085.75) v3@5035.02,4103.79
  MidLayer2 w4: v1@598.52,2773.87 cw(c598.52,2750.94) 614.74,2767.16 cw(c630.96,2783.37) v1@608.02,2783.37 ; v1@598.52,2777.87 cw(c598.52,2764.6) 607.91,2773.99 cw(c617.3,2783.37) v1@604.02,2783.37 ; v1(598.52,2783.37) 623.52,2758.37 715.19,2758.37 723.52,2766.71 v1(797.52,2766.71) ; v1@790.81,2759.99 ccw(c774.59,2743.77) 774.59,2766.71 ccw(c774.59,2789.64) v1@790.81,2773.43 ; v1@793.64,2762.82 ccw(c784.25,2753.43) 784.25,2766.71 ccw(c784.25,2779.99) v1@793.64,2770.6
  Bottom Layer w4: v1(797.52,2766.71) 1056.86,2766.71 1065.19,2758.37 1092.92,2758.37 1125.92,2725.37 1523.54,2725.37 1565.21,2683.71 2168,2683.71 2210,2641.71 v1(3015.19,2641.71) ; v1@801.41,2762.82 cw(c810.8,2753.43) 810.8,2766.71 cw(c810.8,2779.99) v1@801.41,2770.6 ; v1@804.24,2759.99 cw(c820.46,2743.77) 820.46,2766.71 cw(c820.46,2789.64) v1@804.24,2773.43 ; v1@3008.47,2634.99 ccw(c2992.26,2618.77) 2992.26,2641.71 ccw(c2992.26,2664.64) v1@3008.47,2648.43 ; v1@3011.3,2637.82 ccw(c3001.91,2628.43) 3001.91,2641.71 ccw(c3001.91,2654.99) v1@3011.3,2645.6
PORT1.DMINUS: J36.2 U61.18 U62.6 | length 3743.6
  Top Layer w8: J36.2@5187.19,520.56 5176.93,566.04 ; J36.2@5195.02,523.07 5176.93,566.04 ; J36.2@5202.17,526.84 5176.93,566.04 ; J36.2@5209.9,533.07 5176.93,566.04 ; J36.2@5216.12,540.79 5176.93,566.04 ; J36.2@5219.9,547.94 5176.93,566.04 ; J36.2@5222.41,555.77 5176.93,566.04 ; 5435,841.82 5435,880 ; U61.18@5904.65,2240 5904.65,2215.35 5913,2207 5913,2193 5408.3,2193 5326.5,2111.2 5326.5,1223.34 5435,1114.84 5435,880 ; 5176.93,566.04 5176.93,593.07 5155,615 5155,710 5235,790 5400,790 5435,825 5435,880
  Bottom Layer w8: J36.2@5187.19,520.56 5176.93,566.04 ; J36.2@5195.02,523.07 5176.93,566.04 ; J36.2@5202.17,526.84 5176.93,566.04 ; J36.2@5209.9,533.07 5176.93,566.04 ; J36.2@5216.12,540.79 5176.93,566.04 ; J36.2@5219.9,547.94 5176.93,566.04 ; J36.2@5222.41,555.77 5176.93,566.04 ; U62.6@5297.76,972.4 5337.6,972.4 5340,970 5340,895 5155,710 5155,615 5176.93,593.07 5176.93,566.04 ; U62.6@5310.58,965.49 cw(c5327.27,948.79) 5327.27,972.4 cw(c5327.27,996.01) U62.6@5310.58,979.32
PORT1.DPLUS: J36.3 U61.20 U62.1 | length 3513.4
  Top Layer w8: J36.3@5200.22,587.76 5175.16,611.81 ; J36.3@5200.22,635.86 5175.16,611.81 ; J36.3@5205.27,594.5 5175.16,611.81 ; J36.3@5205.27,629.13 5175.16,611.81 ; J36.3@5208.48,601.99 5175.16,611.81 ; J36.3@5208.48,621.63 5175.16,611.81 ; U61.20@5944.01,2240 5944.01,2215.35 5933.33,2204.67 5933.33,2185 5929.33,2181 5413.27,2181 5338.5,2106.23 5338.5,1228.31 5447,1119.81 5447,820.03 5404.97,778 5239.97,778 5167,705.03 5167,619.97 5175.16,611.81 ; 5175.16,611.81 J36.3@5209.9,611.81 5175.16,611.81
  Bottom Layer w8: J36.3@5200.22,587.76 5175.16,611.81 ; J36.3@5200.22,635.86 5175.16,611.81 ; J36.3@5205.27,594.5 5175.16,611.81 ; J36.3@5205.27,629.13 5175.16,611.81 ; J36.3@5208.48,601.99 5175.16,611.81 ; J36.3@5208.48,621.63 5175.16,611.81 ; U62.1@5379.42,965.49 ccw(c5362.73,948.79) 5362.73,972.4 ccw(c5362.73,996.01) U62.1@5379.42,979.32 ; U62.1@5392.24,972.4 5356.4,972.4 5352,968 5352,890.03 5167,705.03 5167,619.97 5175.16,611.81 ; 5175.16,611.81 J36.3@5209.9,611.81 5175.16,611.81
PORT1.VBUS: F2.1 J36.1 J37.1 J38.1 R261.2 R262.2 R263.2 | length 8017.3
  MidLayer1 w4: v1(5081.86,2094.37) 5160.63,2094.37 5168.4,2086.6 5168.4,1888.47 5075,1795.06 5075,1760 5115.86,1719.14 5115.86,1396.39 5273.42,1238.83 5273.42,1098.42 5260,1085 5140,1085 v1(5115,1060) ; v1@5085.75,2090.49 cw(c5095.14,2081.1) 5095.14,2094.37 cw(c5095.14,2107.65) v1@5085.75,2098.26 ; v1@5088.57,2087.66 cw(c5104.79,2071.44) 5104.79,2094.37 cw(c5104.79,2117.31) v1@5088.57,2101.09 ; v1@5115,1065.5 ccw(c5115,1078.78) 5124.39,1069.39 ccw(c5133.78,1060) v1@5120.5,1060 ; v1@5115,1069.5 ccw(c5115,1092.43) 5131.22,1076.22 ccw(c5147.43,1060) v1@5124.5,1060
  MidLayer2 w4: v1(5115,1060) 5130.37,1075.37 5264.25,1075.37 5274.19,1065.43 5274.19,864.19 5260,850 5065,850 5038,823 5038,523 5061,500 5115,500 5160.67,454.33 ; J36.1@5185.93,440 ccw(c5160.67,424.9) 5160.67,454.33 ; J36.1@5185.93,468.66 cw(c5160.67,483.76) 5160.67,454.33 ; J36.1@5189.36,442.06 ccw(c5167.72,429.12) 5167.72,454.33 ccw(c5167.72,479.54) J36.1@5189.36,466.61 ; J36.1@5192.8,444.11 ccw(c5174.78,433.33) 5174.78,454.33 ccw(c5174.78,475.33) J36.1@5192.8,464.55 ; J36.1@5209.9,454.33 5160.67,454.33
  Bottom Layer w4: R263.2@5012.23,2152.92 cw(c4996.32,2137.01) 5018.82,2137.01 cw(c5041.32,2137.01) R263.2@5025.41,2152.92 ; R263.2@5012.23,2167.08 ccw(c4996.32,2182.99) 5018.82,2182.99 ccw(c5041.32,2182.99) R263.2@5025.41,2167.08 ; R262.2@5012.23,2208.83 cw(c4996.32,2192.92) 5018.82,2192.92 cw(c5041.32,2192.92) R262.2@5025.41,2208.83 ; R262.2@5012.23,2222.99 ccw(c4996.32,2238.9) 5018.82,2238.9 ccw(c5041.32,2238.9) R262.2@5025.41,2222.99 ; R261.2@5012.23,2264.74 cw(c4996.32,2248.83) 5018.82,2248.83 cw(c5041.32,2248.83) R261.2@5025.41,2264.74 ; R263.2@5015.06,2155.75 cw(c5005.98,2146.67) 5018.82,2146.67 cw(c5031.66,2146.67) R263.2@5022.58,2155.75 ; R263.2@5015.06,2164.25 ccw(c5005.98,2173.33) 5018.82,2173.33 ccw(c5031.66,2173.33) R263.2@5022.58,2164.25 ; R262.2@5015.06,2211.66 cw(c5005.98,2202.58) 5018.82,2202.58 cw(c5031.66,2202.58) R262.2@5022.58,2211.66 ; R262.2@5015.06,2220.16 ccw(c5005.98,2229.24) 5018.82,2229.24 ccw(c5031.66,2229.24) R262.2@5022.58,2220.16 ; R261.2@5015.06,2267.56 cw(c5005.98,2258.48) 5018.82,2258.48 cw(c5031.66,2258.48) R261.2@5022.58,2267.56 ; R261.2@5018.82,2271.82 R262.2@5018.82,2215.91 R263.2@5018.82,2160 5018.82,2121.18 5045.63,2094.37 v1(5081.86,2094.37) ; v1@5075.14,2087.66 ccw(c5058.92,2071.44) 5058.92,2094.37 ccw(c5058.92,2117.31) v1@5075.14,2101.09 ; v1@5077.97,2090.49 ccw(c5068.58,2081.1) 5068.58,2094.37 ccw(c5068.58,2107.65) v1@5077.97,2098.26
  Bottom Layer w20: F2.1@2531.46,1123.58 2658.32,1123.58 2690.19,1091.71 2690.19,775.04 2831.86,633.37 3716.63,633.37 4003.19,346.81 4688.19,346.81 4723.81,311.19 5086.19,311.19 5136,361 5176,361 5209.9,394.9 ; F2.1@2556.4,1098.63 cw(c2616.62,1038.41) 2616.62,1123.58 cw(c2616.62,1208.74) F2.1@2556.4,1148.52 ; J36.1@5195.81,440.24 cw(c5161.8,406.24) 5209.9,406.24 cw(c5257.99,406.24) J36.1@5223.98,440.24 ; J36.1@5209.9,454.33 5209.9,394.9 ; J37.1@5510.1,452.52 5529.9,364.8 J37.1@5549.69,452.52 ; J37.1@5529.9,454.72 5529.9,344.9 5501.04,316.04 5288.75,316.04 5209.9,394.9 ; 5530,343.58 5752.77,343.58 5784.19,375 5835,375 5849.9,389.9 ; J38.1@5830.21,451.25 5849.9,389.9 ; J38.1@5849.9,454.33 5849.9,389.9 ; J38.1@5869.58,451.25 5849.9,389.9
PORT2.DMINUS: J37.2 U61.25 U63.6 | length 3563.7
  Top Layer w8: J37.2@5507.19,520.95 5496.93,566.43 ; J37.2@5515.02,523.46 5496.93,566.43 ; J37.2@5522.17,527.24 5496.93,566.43 ; J37.2@5529.9,533.46 5496.93,566.43 ; J37.2@5536.12,541.19 5496.93,566.43 ; J37.2@5539.9,548.34 5496.93,566.43 ; J37.2@5542.41,556.17 5496.93,566.43 ; U61.25@6042.44,2240 6042.44,2215.35 6053.12,2204.67 6053.12,2190 6023.12,2160 5421.97,2160 5359.5,2097.53 5359.5,1237.01 5468,1128.51 5468,737 5475,730 5475,615.39 5496.93,593.47 5496.93,566.43
  Bottom Layer w8: J37.2@5507.19,520.95 5496.93,566.43 ; J37.2@5515.02,523.46 5496.93,566.43 ; J37.2@5522.17,527.24 5496.93,566.43 ; J37.2@5529.9,533.46 5496.93,566.43 ; J37.2@5536.12,541.19 5496.93,566.43 ; J37.2@5539.9,548.34 5496.93,566.43 ; J37.2@5542.41,556.17 5496.93,566.43 ; U63.6@5547.76,972.4 5583.6,972.4 5588,968 5588,843 5475,730 5475,615.39 5496.93,593.47 5496.93,566.43 ; U63.6@5560.58,965.49 cw(c5577.27,948.79) 5577.27,972.4 cw(c5577.27,996.01) U63.6@5560.58,979.32
PORT2.DPLUS: J37.3 U61.27 U63.1 | length 3366.5
  Top Layer w8: J37.3@5520.22,588.16 5495.16,612.2 ; J37.3@5520.22,636.25 5495.16,612.2 ; J37.3@5525.27,594.89 5495.16,612.2 ; J37.3@5525.27,629.52 5495.16,612.2 ; J37.3@5528.48,602.39 5495.16,612.2 ; J37.3@5528.48,622.02 5495.16,612.2 ; U61.27@6081.81,2240 6081.81,2215.35 6071.12,2204.67 6071.12,2191.03 6028.1,2148 5426.94,2148 5371.5,2092.56 5371.5,1241.98 5480,1133.48 5480,741.97 5487,734.97 5487,620.36 5495.16,612.2 ; 5495.16,612.2 J37.3@5529.9,612.2 5495.16,612.2
  Bottom Layer w8: J37.3@5520.22,588.16 5495.16,612.2 ; J37.3@5520.22,636.25 5495.16,612.2 ; J37.3@5525.27,594.89 5495.16,612.2 ; J37.3@5525.27,629.52 5495.16,612.2 ; J37.3@5528.48,602.39 5495.16,612.2 ; J37.3@5528.48,622.02 5495.16,612.2 ; U63.1@5629.42,965.49 ccw(c5612.73,948.79) 5612.73,972.4 ccw(c5612.73,996.01) U63.1@5629.42,979.32 ; U63.1@5642.24,972.4 5607.4,972.4 5600,965 5600,838.03 5487,725.03 5487,620.36 5495.16,612.2 ; 5495.16,612.2 J37.3@5529.9,612.2 5495.16,612.2
PORT3.DMINUS: J38.2 U61.32 U64.6 | length 3903.1
  Top Layer w8: J38.2@5827.19,520.56 5816.93,566.04 ; J38.2@5835.02,523.07 5816.93,566.04 ; J38.2@5842.17,526.84 5816.93,566.04 ; J38.2@5849.9,533.07 5816.93,566.04 ; J38.2@5856.12,540.79 5816.93,566.04 ; J38.2@5859.9,547.94 5816.93,566.04 ; J38.2@5862.41,555.77 5816.93,566.04 ; U61.32@6180.24,2240 6180.24,2215.35 6190.92,2204.67 6190.92,2189.67 6128.25,2127 5435.64,2127 5392.5,2083.86 5392.5,1250.68 5501,1142.18 5501,794 5515,780 5775,780 5795,760 5795,615 5816.93,593.07 5816.93,566.04
  Bottom Layer w8: U64.6@5797.76,972.4 5832.6,972.4 5838,967 5838,805.03 5795,762.03 5795,615 5816.93,593.07 5816.93,566.04 ; U64.6@5810.58,965.49 cw(c5827.27,948.79) 5827.27,972.4 cw(c5827.27,996.01) U64.6@5810.58,979.32 ; J38.2@5827.19,520.56 5816.93,566.04 ; J38.2@5835.02,523.07 5816.93,566.04 ; J38.2@5842.17,526.84 5816.93,566.04 ; J38.2@5849.9,533.07 5816.93,566.04 ; J38.2@5856.12,540.79 5816.93,566.04 ; J38.2@5859.9,547.94 5816.93,566.04 ; J38.2@5862.41,555.77 5816.93,566.04
PORT3.DPLUS: J38.3 U61.34 U64.1 | length 3720
  Top Layer w8: J38.3@5840.22,587.76 5815.16,611.81 ; J38.3@5840.22,635.86 5815.16,611.81 ; J38.3@5845.27,594.5 5815.16,611.81 ; J38.3@5845.27,629.13 5815.16,611.81 ; J38.3@5848.48,601.99 5815.16,611.81 ; J38.3@5848.48,621.63 5815.16,611.81 ; U61.34@6219.6,2240 6219.6,2200.35 6134.25,2115 5440.61,2115 5404.5,2078.89 5404.5,1255.65 5513,1147.15 5513,798.97 5519.97,792 5780,792 5807,765 5807,619.97 5815.16,611.81 ; 5815.16,611.81 J38.3@5849.9,611.81 5815.16,611.81
  Bottom Layer w8: J38.3@5840.22,587.76 5815.16,611.81 ; J38.3@5840.22,635.86 5815.16,611.81 ; J38.3@5845.27,594.5 5815.16,611.81 ; J38.3@5845.27,629.13 5815.16,611.81 ; J38.3@5848.48,601.99 5815.16,611.81 ; J38.3@5848.48,621.63 5815.16,611.81 ; 5850,810 5850,820 ; U64.1@5879.42,965.49 ccw(c5862.73,948.79) 5862.73,972.4 ccw(c5862.73,996.01) U64.1@5879.42,979.32 ; U64.1@5892.24,972.4 5852.4,972.4 5850,970 5850,820 ; 5815.16,611.81 J38.3@5849.9,611.81 5815.16,611.81 ; 5815.16,611.81 5807,619.97 5807,757.06 5850,800.06 5850,820
PROG_B: R74.2 U8.A2 | length 11007.1
  Top Layer w4: v1(4490.19,5533.37) 4587.21,5533.37 4631.86,5488.73 4631.86,5126.04 4665.19,5092.71 4665.19,4913.02 4736.5,4841.71 4833.19,4841.71 4863.86,4811.04 4863.86,4797.39 4904.25,4757 4928,4757 4937.24,4747.76 4937.24,4720 4937.24,4710 U8.A2@4937.24,4682.13 ; v1@4494.08,5529.49 cw(c4503.47,5520.1) 4503.47,5533.37 cw(c4503.47,5546.65) v1@4494.08,5537.26 ; v1@4496.91,5526.66 cw(c4513.13,5510.44) 4513.13,5533.37 cw(c4513.13,5556.31) v1@4496.91,5540.09 ; U8.A2@4931.94,4687.43 ccw(c4919.14,4700.23) 4937.24,4700.23 ccw(c4955.35,4700.23) U8.A2@4942.55,4687.43 ; U8.A2@4932.05,4687.32 ccw(c4919.52,4699.85) 4937.24,4699.85 ccw(c4954.97,4699.85) U8.A2@4942.44,4687.32
  MidLayer2 w4: v1(4490.19,5533.37) 4598.52,5641.71 4755,5641.71 4830,5716.71 5312.21,5716.71 5337.21,5691.71 6614.6,5691.71 6797.27,5509.04 7105.96,5509.04 7145,5470 7255,5470 7267,5458 7267,5333 7495,5105 7807.25,5105 8106.86,4805.39 8106.86,4735 ; v1@4490.19,5538.87 ccw(c4490.19,5552.15) 4499.58,5542.76 ccw(c4508.97,5533.37) v1@4495.69,5533.37 ; v1@4490.19,5542.87 ccw(c4490.19,5565.81) 4506.41,5549.59 ccw(c4522.63,5533.37) v1@4499.69,5533.37 ; v1(7223.52,3325.04) 7315.19,3416.71 7323.86,3425.37 7323.86,3545.23 7345,3566.37 7706.52,3566.37 7965.19,3825.04 7965.19,3864.06 8065.19,3964.06 8065.19,3995.28 8106.86,4036.94 8106.86,4735 ; v1@7223.52,3330.54 ccw(c7223.52,3343.82) 7232.91,3334.43 ccw(c7242.3,3325.04) v1@7229.02,3325.04 ; v1@7223.52,3334.54 ccw(c7223.52,3357.48) 7239.74,3341.26 ccw(c7255.96,3325.04) v1@7233.02,3325.04 ; 8106.86,4755 8106.86,4735
  Bottom Layer w4: R74.2@5699.23,2707.92 cw(c5683.32,2692.01) 5705.82,2692.01 cw(c5728.32,2692.01) R74.2@5712.41,2707.92 ; R74.2@5702.06,2710.75 cw(c5692.98,2701.67) 5705.82,2701.67 cw(c5718.66,2701.67) R74.2@5709.58,2710.75 ; R74.2@5705.82,2715 5705.82,2608.37 5722.49,2591.71 5776.88,2591.71 5807.21,2561.37 6203.86,2561.37 6250.19,2515.04 6552.21,2515.04 6595.54,2558.37 6922.88,2558.37 6972.88,2608.37 7123.52,2608.37 7340.19,2825.04 7673.52,2825.04 7848.52,3000.04 7848.52,3033.37 7831.86,3050.04 7794.96,3050.04 7770,3075 7600,3075 7553.63,3121.37 7402.19,3121.37 7223.52,3300.04 v1(7223.52,3325.04) ; v1@7216.81,3318.32 cw(c7200.59,3302.11) 7223.52,3302.11 cw(c7246.46,3302.11) v1@7230.24,3318.32 ; v1@7219.64,3321.15 cw(c7210.25,3311.76) 7223.52,3311.76 cw(c7236.8,3311.76) v1@7227.41,3321.15
PWFBIN: C42.2 L1.2 U5.8 | length 1353.8
  MidLayer2 w12: v4(2320,5410) 2443.88,5410 2454.42,5420.54 2820,5420.54 3005.54,5235 v4(3140,5235) ; v4@2324.11,5405.89 cw(c2334.03,5395.97) 2334.03,5410 cw(c2334.03,5424.03) v4@2324.11,5414.11 ; v4@3135.89,5230.89 ccw(c3125.97,5220.97) 3125.97,5235 ccw(c3125.97,5249.03) v4@3135.89,5239.11
  Bottom Layer w12: v4@2315.89,5405.89 cw(c2305.97,5395.97) 2320,5395.97 cw(c2334.03,5395.97) v4@2324.11,5405.89 ; v4(2320,5410) 2320,5365 2331.34,5353.66 U5.8@2331.34,5322.68 ; 2326.07,5358.93 cw(c2313.34,5346.2) U5.8@2331.34,5346.2 ; L1.2@3115.32,5185.62 ccw(c3091.96,5208.98) 3125,5208.98 ccw(c3158.04,5208.98) L1.2@3134.68,5185.62 ; v4(3140,5235) 3125,5220 L1.2@3125,5175.94 3145.67,5155.28 C42.2@3145.67,5120 ; C42.2@3141.56,5124.11 ccw(c3131.64,5134.03) 3145.67,5134.03 ccw(c3159.7,5134.03) C42.2@3149.78,5124.11 ; C42.2@3145.67,5121.52 cw(c3208.95,5121.52) L1.2@3164.2,5166.27 ; 3145.67,5150.49 cw(c3179.98,5150.49) L1.2@3155.72,5174.75